# Altium PCB A313_6.PcbDoc (part 3 of 3)
Units mm, origin at the board's own origin, x right, y up, seen from the top; angles counter-clockwise.
Board outline 230.01 x 157.01 mm, 2 copper layers (Top Layer, Bottom Layer); 234 components, 195 nets, 1068 pads, 566 vias.
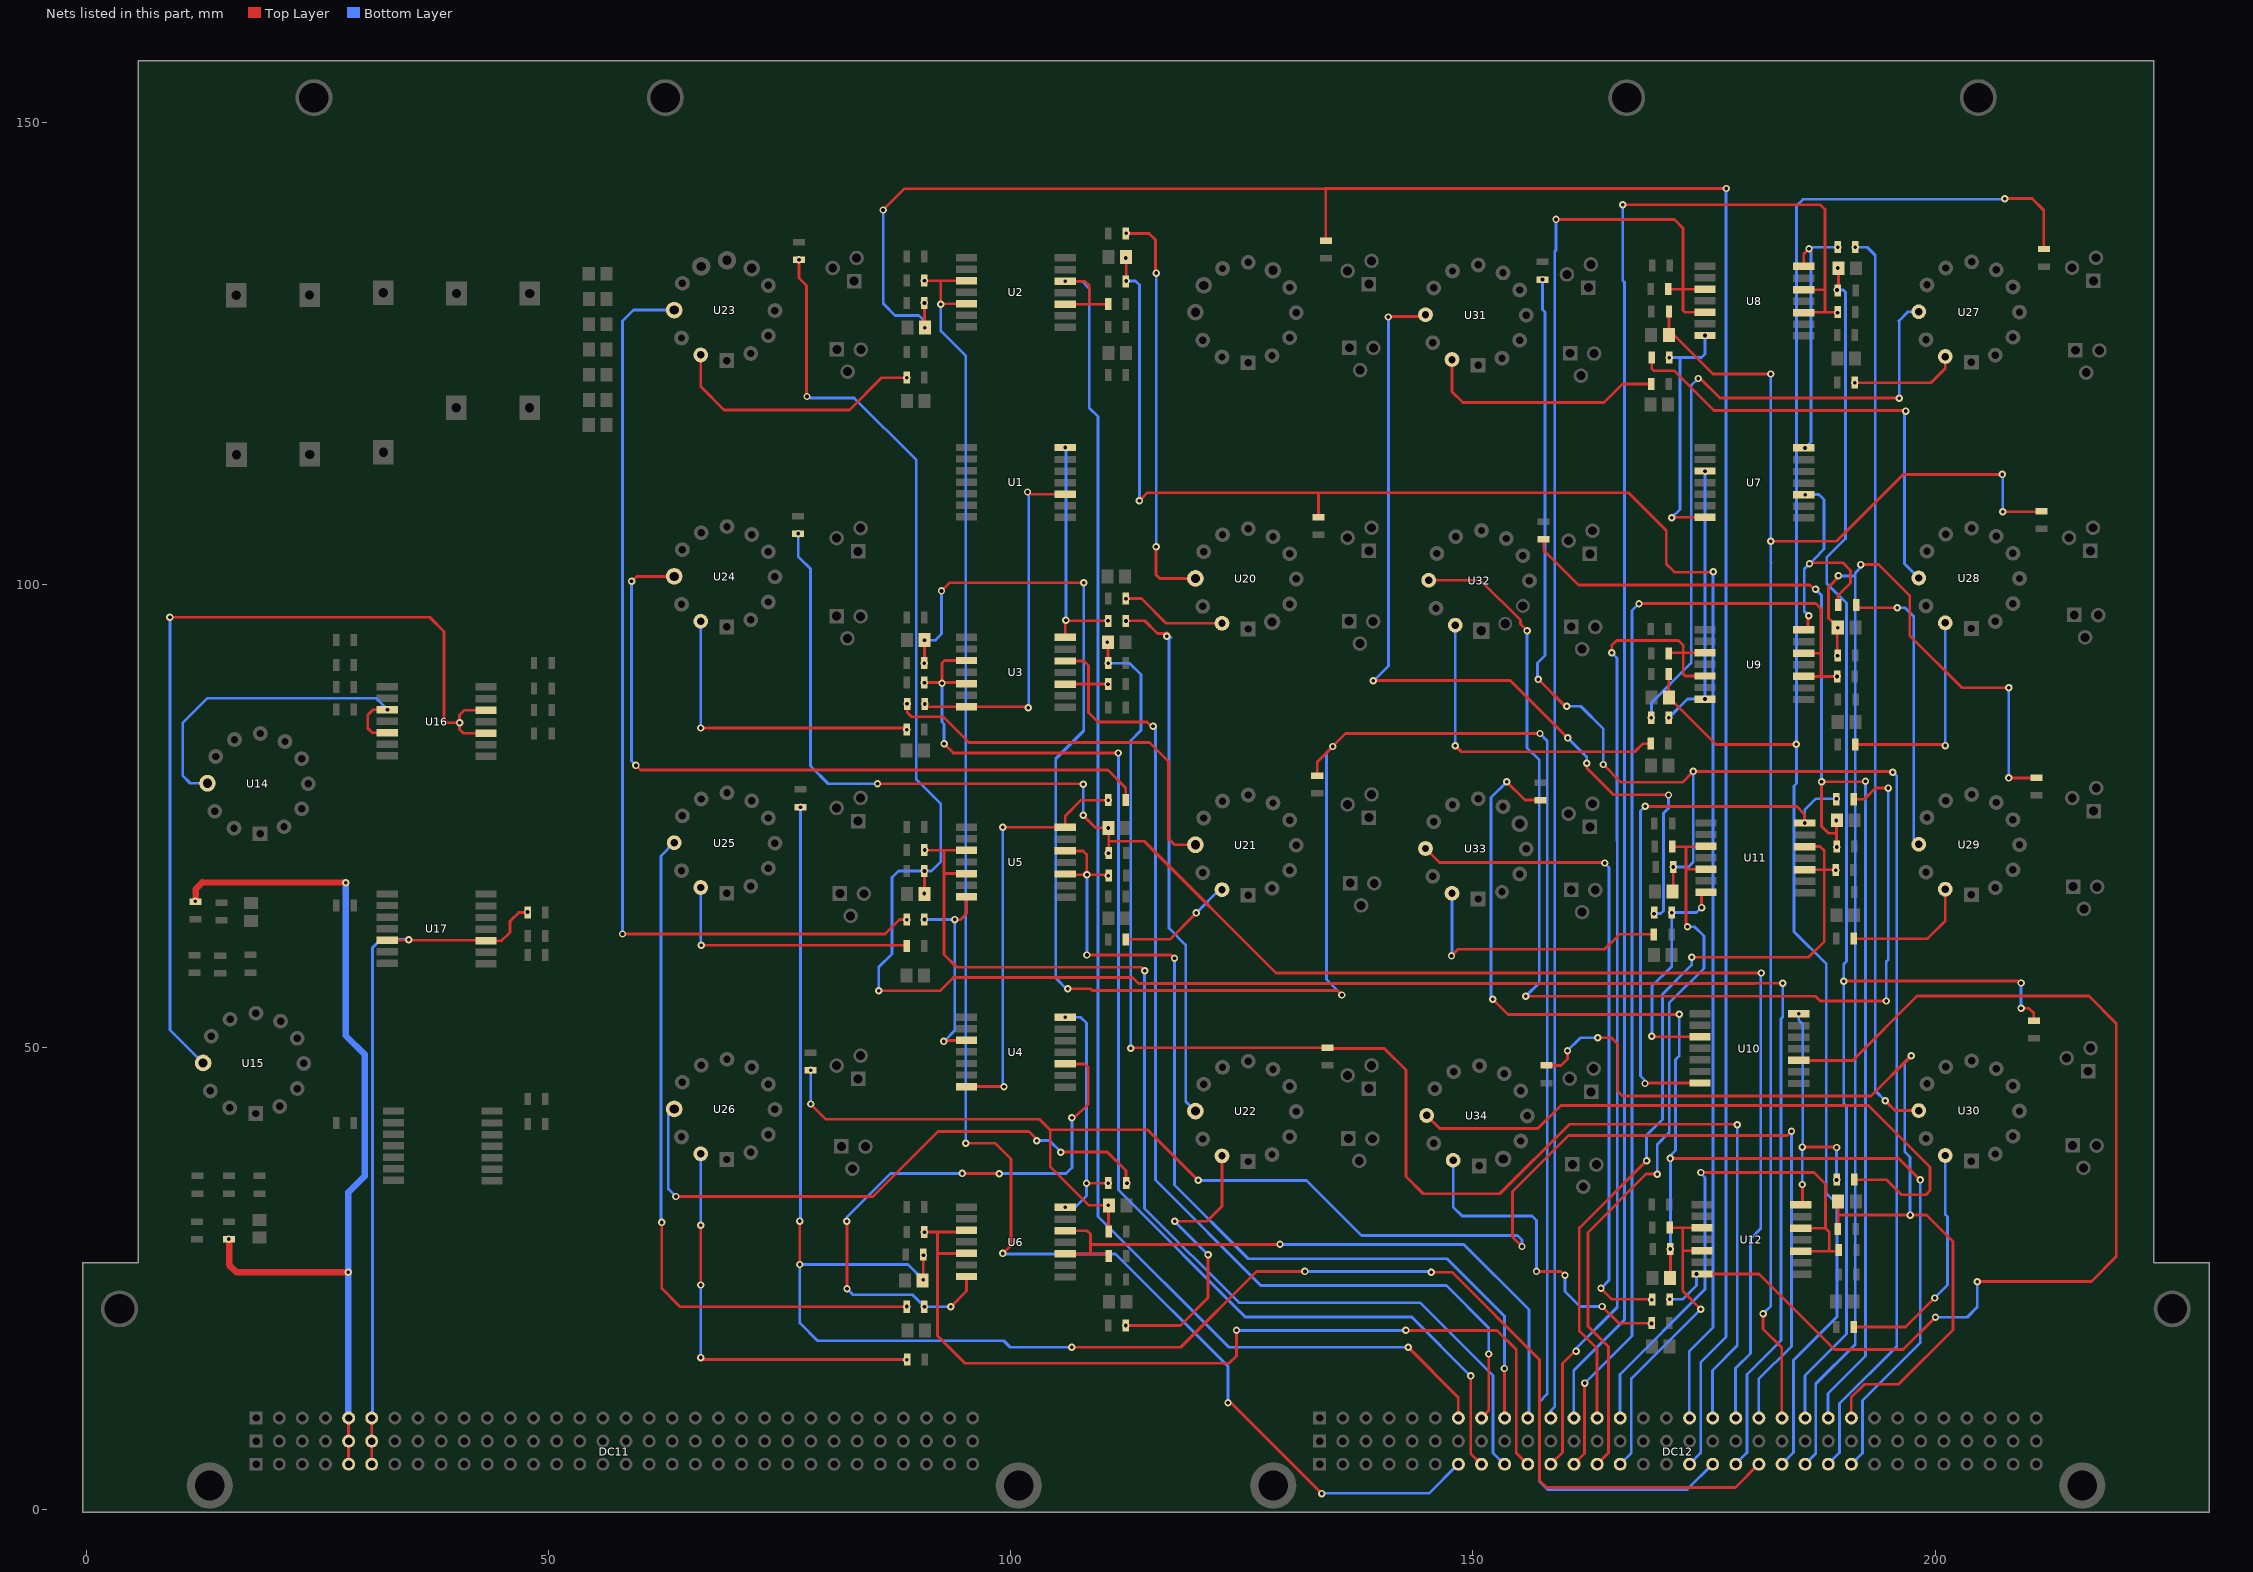
[diagram p3: the nets of this part, all layers, seen from the top]

## Via types
v1: diameter 0.8, hole 0.4, Top Layer to Bottom Layer, 566 vias

## Nets (pads, with @x,y where several pads share a name; then routed paths per layer and width w, separated by ;. In a path a pad name is that pad's centre, name@x,y a point inside that pad or via, vN(x,y) a via of type N, cw(c..) or ccw(c..) an arc to the next point about the centre after c; other vN are vias at no path point) (continued)
NetR40_2: R40.2 U20.10 | length 44.1
  Top Layer w0.3: R40.2@112.451,138.018 114.982,138.018 115.675,137.325 v1@115.675,133.725 ; v1@115.725,103.925 115.725,101.1 116.129,100.696 U20.10@119.985,100.696
  Bottom Layer w0.3: v1@115.75,103.95 v1(115.75,133.725)
  other v1: 115.725,104.125 112.5,138.025
NetR41_2: R41.2 U20.12 | length 11.5
  Top Layer w0.3: R41.2@112.451,98.518 114.157,98.518 116.83,95.845 U20.12@122.855,95.845
  other v1: 112.475,98.5
NetR43_1: R43.1 U1.10 U3.7 | length 38.4
  Top Layer w0.3: R43.1@90.674,87.107 90.96,86.821 U3.7@95.225,86.821 101.871,86.821 v1@101.9,86.85 ; v1@102.025,109.825 102.039,109.811 U1.10@105.9,109.811
  Bottom Layer w0.3: v1@101.925,86.95 101.965,86.99 101.965,110.04 v1@102.025,110.1
  other v1: 101.9,86.725 90.725,87.125 101.825,110.05
NetR43_2: R43.2 U21.10 | length 42.9
  Top Layer w0.3: R43.2@88.824,87.132 88.824,86.176 89.25,85.75 92.675,85.75 95.475,82.95 115.025,82.95 117.075,80.9 117.075,72.55 117.729,71.896 U21.10@119.985,71.896
  other v1: 88.8,87.15
NetR44_2: R44.2 U21.12 | length 12.9
  Top Layer w0.3: R44.2@112.451,61.668 117.218,61.668 v1(120.075,64.525)
  Bottom Layer w0.3: v1@120.335,64.525 v1(120.075,64.525) 122.595,67.045 U21.12@122.855,67.045
NetR46_1: R46.1 U1.14 U3.14 | length 24.9
  Top Layer w0.3: U3.14@105.9,94.321 105.9,95.775 106.243,96.118 R46.1@110.551,96.118
  Bottom Layer w0.3: v1(105.975,96.175) v1@105.975,114.861
  other v1: 110.525,96.125 105.9,114.861
NetR46_2: R46.2 U22.10 | length 58.4
  Top Layer w0.3: R46.2@112.451,96.118 114.507,96.118 115.875,94.75 v1@117.05,94.75
  Bottom Layer w0.3: v1@116.825,94.825 117.34,94.31 117.125,94.095 117.125,62.875 118.925,61.075 118.925,44.156 U22.10@119.985,43.096
  other v1: 116.875,94.45 112.475,96.1
NetR47_2: R47.2 U22.12 | length 31.1
  Top Layer w0.3: R47.2@112.451,19.918 118.368,19.918 121.35,22.9 v1(121.35,27.55) ; v1(117.75,31.175) 121.225,31.175 122.855,32.805 U22.12@122.855,38.245
  Bottom Layer w0.3: v1(117.75,31.175) 117.75,31.15 v1(121.35,27.55)
  other v1: 112.45,19.9
NetR49_1: R49.1 U4.3 U5.7 | length 23.1
  Top Layer w0.3: v1(92.775,50.625) 92.891,50.741 U4.3@95.225,50.741 ; v1@93.95,63.775 94.55,63.775 95.225,64.45 U5.7@95.225,66.281
  Bottom Layer w0.3: v1(90.674,63.807) v1(93.95,63.807) 93.95,51.8 v1@92.95,50.8 ; v1@92.65,50.8 v1@92.95,50.8 ; v1(92.775,50.625) v1@92.95,50.8
NetR49_2: R49.2 U23.10 | length 103.8
  Top Layer w0.3: v1(58.025,62.25) 86.425,62.25 87.982,63.807 R49.2@88.774,63.807
  Bottom Layer w0.3: v1(58.025,62.25) 58.025,128.55 59.196,129.721 U23.10@63.61,129.721
  other v1: 88.75,63.775
NetR50_2: R50.2 U23.12 | length 28.2
  Top Layer w0.3: U23.12@66.48,124.87 66.48,121.445 69,118.925 82.55,118.925 86.032,122.407 v1(88.774,122.407)
NetR52_1: R52.1 U4.7 U5.14 | length 45.8
  Top Layer w0.3: U4.7@95.225,45.741 v1@99.275,45.741 ; v1@98.931,73.781 v1(99.15,73.781) U5.14@105.9,73.781 105.9,75.025 107.593,76.718 R52.1@110.551,76.718
  Bottom Layer w0.3: v1@99.15,45.6 v1(99.15,73.781)
  other v1: 99.275,45.725 110.55,76.725
NetR52_2: R52.2 U24.10 | length 80.2
  Top Layer w0.3: v1(59.003,100.38) 59.544,100.921 U24.10@63.61,100.921 ; v1(59.475,80.475) 59.975,79.975 110.525,79.975 112.451,78.049 R52.2@112.451,76.718
  Bottom Layer w0.3: v1(59.003,100.38) 59.003,80.947 v1(59.475,80.475)
NetR53_2: R53.2 U24.12 | length 33.9
  Top Layer w0.3: v1(66.48,84.52) 88.687,84.52 R53.2@88.774,84.607
  Bottom Layer w0.3: U24.12@66.48,96.07 v1(66.48,84.52) v1@66.5,84.5
  other v1: 88.775,84.325
NetR55_1: R55.1 U4.10 U6.7 | length 64
  Top Layer w0.3: v1(82.3,23.875) v1@82.3,31.175 ; v1(93.525,21.925) 95.225,23.625 U6.7@95.225,25.201 ; v1(94.775,36.35) 98.75,36.35 v1(98.775,36.325) ; U4.10@105.9,48.191 107.984,48.191 108.4,47.775 108.4,43.875 v1@106.85,42.325
  Bottom Layer w0.3: v1(82.3,23.875) 82.95,23.225 89.381,23.225 v1(90.674,21.932) 93.518,21.932 v1(93.525,21.925) ; 82.3,31.625 87.025,36.35 v1(94.775,36.35) ; v1@98.775,36.35 106,36.35 106.625,36.975 v1(106.625,42.375)
  other v1: 82.275,31.175
NetR55_2: R55.2 U25.10 | length 75.9
  Top Layer w0.3: v1(62.275,31.05) 62.275,23.9 64.243,21.932 R55.2@88.774,21.932
  Bottom Layer w0.3: v1@62.175,31.25 62.175,70.686 U25.10@63.61,72.121
  other v1: 88.775,21.95
NetR56_2: R56.2 U25.12 | length 28.8
  Top Layer w0.3: v1(66.525,61.035) 88.696,61.035 R56.2@88.774,60.957
  Bottom Layer w0.3: U25.12@66.48,67.27 66.48,61.08 v1(66.525,61.035) v1@66.525,60.775
NetR58_1: R58.1 U4.14 U6.14 | length 26.4
  Top Layer w0.3: v1(108.2,35.293) R58.1@110.576,35.293
  Bottom Layer w0.3: v1(105.9,32.701) 107.001,32.701 108.2,33.9 v1(108.2,35.293) 108.2,52.6 107.559,53.241 v1(105.9,53.241)
  other v1: 110.55,35.275
NetR58_2: R58.2 U26.10 | length 64.8
  Top Layer w0.3: v1(63.8,33.85) 85.125,33.85 92.162,40.887 101.988,40.887 v1@102.85,40.025 ; v1@105.4,38.675 110.45,38.675 112.476,36.649 R58.2@112.476,35.293
  Bottom Layer w0.3: U26.10@63.61,43.321 62.975,42.686 62.975,34.675 v1(63.8,33.85) v1@63.825,33.85 ; v1(102.825,39.9) 104.175,39.9 v1(105.425,38.65)
  other v1: 112.574,35.3
NetR59_2: R59.2 U26.12 | length 44.8
  Top Layer w0.3: v1@66.375,24.175 v1(66.48,24.28) v1(66.48,30.73) ; v1@66.625,16.175 66.682,16.232 R59.2@88.799,16.232
  Bottom Layer w0.3: v1@66.375,30.625 v1(66.48,30.73) U26.12@66.48,38.47 ; v1(66.48,24.28) v1(66.48,16.434) v1@66.682,16.232
  other v1: 88.75,16.2
NetR61_1: R61.1 U7.3 U9.7 | length 29.4
  Bottom Layer w0.3: v1(171.174,85.632) 173.194,87.652 v1(175.099,87.652) v1(175.099,112.275)
NetR61_2: R61.2 U27.10 | length 72.4
  Top Layer w0.3: v1(174.375,122.325) 174.575,122.325 176.7,120.2 v1(196.1,120.2)
  Bottom Layer w0.3: v1@169.299,85.524 169.299,87.249 173.6,91.55 173.6,121.55 v1(174.375,122.325) ; v1(196.1,120.2) 196.1,128.507 196.054,128.554 197.046,129.546 U27.10@198.21,129.546
  other v1: 169.274,85.632
NetR62_2: R62.2 U27.12 | length 11.7
  Top Layer w0.3: R62.2@191.276,121.868 199.543,121.868 201.08,123.405 U27.12@201.08,124.695
  other v1: 191.3,121.85
NetR64_1: R64.1 U7.7 U8.7 | length 27.5
  Top Layer w0.3: v1(171.5,107.275) 171.539,107.314 U7.7@175.099,107.314 ; v1(175.099,126.976) U8.7@175.2,126.875
  Bottom Layer w0.3: v1(171.224,124.582) 172.375,124.582 ; v1(171.5,107.275) 172.4,108.175 172.4,124.557 172.375,124.582 ; v1(175.099,126.976) 175.099,124.976 174.705,124.582 172.375,124.582
NetR64_2: R64.2 U28.10 | length 49.4
  Top Layer w0.3: R64.2@169.324,124.582 169.324,123.401 169.575,123.15 171.775,123.15 176.05,118.875 v1@196.925,118.875
  Bottom Layer w0.3: v1@196.675,118.875 196.675,102.281 U28.10@198.21,100.746
  other v1: 196.8,118.8
NetR65_2: R65.2 U28.12 | length 23.3
  Top Layer w0.3: R65.2@191.326,82.743 200.962,82.743 v1(201.08,82.625)
  Bottom Layer w0.3: v1@201.05,82.4 201.08,82.43 v1(201.08,82.625) U28.12@201.08,95.895
NetR67_1: R67.1 U7.10 U9.14 | length 26.7
  Top Layer w0.3: U7.10@185.774,109.764 v1(185.95,109.764) ; U9.14@186.224,95.227 v1@186.224,96.549 ; v1@186.4,102.4 190,102.4 190.835,101.565 190.835,100.21 189.476,98.851 R67.1@189.476,97.868
  Bottom Layer w0.3: v1(185.95,109.764) 187.436,109.764 187.975,109.225 187.975,103.875 186.975,102.875 v1@186.525,102.425 ; v1(186.3,96.675) 185.825,97.15 185.825,101.725 v1(186.4,102.3) v1@186.525,102.425 ; v1@186.525,102.125 v1@186.525,102.425
NetR67_2: R67.2 U29.10 | length 31.6
  Top Layer w0.3: R67.2@191.426,97.818 191.719,97.525 v1(195.875,97.525)
  Bottom Layer w0.3: v1(195.875,97.525) 196.725,97.525 197.675,96.575 197.675,72.481 U29.10@198.21,71.946
NetR68_2: R68.2 U29.12 | length 14.1
  Top Layer w0.3: R68.2@191.201,61.743 199.168,61.743 201.08,63.655 U29.12@201.08,67.095
NetR70_1: R70.1 U7.14 U8.14 | length 27.7
  Top Layer w0.3: U7.14@185.575,115.013 U7.14@185.774,114.814 v1(185.911,114.814) ; U8.14@185.774,134.476 185.774,135.799 v1(186.339,136.364)
  Bottom Layer w0.3: v1(185.911,114.814) 186.55,115.453 186.55,116.425 186.55,136.461 v1@186.493,136.518 ; v1(186.339,136.364) v1@186.493,136.518 ; v1(189.451,136.518) v1@186.493,136.518
NetR70_2: R70.2 U30.10 | length 98.5
  Top Layer w0.3: v1@194.425,44.05 194.75,44.05 195.654,43.146 U30.10@198.21,43.146
  Bottom Layer w0.3: v1(191.351,136.518) 192.642,136.518 193.51,135.65 193.51,45.29 v1(194.575,44.225)
NetR71_2: R71.2 U30.12 | length 26.1
  Top Layer w0.3: R71.2@191.176,19.743 196.793,19.743 v1(199.925,22.875)
  Bottom Layer w0.3: v1(199.925,22.875) 201.325,24.275 201.325,31.675 201.08,31.92 U30.12@201.08,38.295
NetR73_1: R73.1 U10.3 U11.7 | length 25.2
  Top Layer w0.3: v1@169.376,51.126 U10.3@174.55,51.126 ; v1(174.725,65.1) 174.725,66.7 174.776,66.751 U11.7@175.2,66.751
  Bottom Layer w0.3: v1@169.35,51 v1(169.35,51.2) 169.35,56.6 171.499,58.749 v1(171.499,64.557) 174.182,64.557 v1(174.725,65.1)
NetR73_2: R73.2 U31.10 | length 95.8
  Top Layer w0.3: v1(139.225,89.625) 139.275,89.675 154.025,89.675 v1(160.25,83.45) ; v1@140.85,129.021 U31.10@144.86,129.021 ; v1(162.3,80.7) 162.3,80.2 165.2,77.3 v1@171.15,77.3
  Bottom Layer w0.3: v1(139.225,89.625) 140.85,91.25 v1@140.85,129.1 ; v1(160.25,83.45) 162.3,81.4 v1(162.3,80.7) ; v1(169.575,64.45) 170.3,64.45 170.6,64.75 170.6,75.3 171.15,75.85 v1(171.15,77.275)
  other v1: 140.85,128.975
NetR74_2: R74.2 U31.12 | length 26.8
  Top Layer w0.3: U31.12@147.73,124.37 147.73,120.895 148.9,119.725 164.15,119.725 166.157,121.732 R74.2@169.274,121.732 169.299,121.757 R74.2@169.299,122.157
NetR76_1: R76.1 U10.7 U11.14 | length 60.3
  Top Layer w0.3: v1@168.625,76.025 185.025,76.025 185.875,75.175 v1(185.875,74.251) 186.075,74.251 U11.14@186.125,74.301 ; v1@168.901,46.126 U10.7@174.55,46.126
  Bottom Layer w0.3: v1(168.625,76.05) 168.125,75.55 168.125,46.875 v1@168.888,46.113 ; v1(185.875,74.251) 185.875,75.675 187.079,76.879 v1(189.309,76.879)
  other v1: 168.6,46.075
NetR76_2: R76.2 U32.10 | length 120.3
  Top Layer w0.3: U32.10@145.21,100.496 150.829,100.496 155.125,96.2 155.125,95.775 v1(155.85,95.05) ; v1(155.711,55.511) 187.05,55.511 187.561,55 v1(194.7,55) ; R76.2@191.201,76.818 192.318,76.818 193.525,78.025 v1(194.9,78.025)
  Bottom Layer w0.3: v1(155.711,55.511) 157.175,56.975 157.175,81.05 155.85,82.375 v1(155.85,95.05) ; v1(194.7,55) 194.7,59.25 194.9,59.45 v1(194.9,78.025)
NetR77_2: R77.2 U32.12 | length 34.8
  Top Layer w0.3: v1(148.08,82.605) 148.735,81.95 167.5,81.95 168.382,82.832 R77.2@169.224,82.832
  Bottom Layer w0.3: v1(148.08,82.605) U32.12@148.08,95.645
NetR79_1: R79.1 U10.10 U12.7 | length 122.7
  Top Layer w0.3: U12.7@174.775,25.476 180.924,25.476 189.1,17.3 196.525,17.3 v1(200.025,20.8) ; U10.10@185.225,48.576 191.076,48.576 198.025,55.525 216.625,55.525 219.575,52.575 219.575,27.35 216.875,24.65 v1(204.525,24.65) v1@204.3,24.65 ; v1@199.912,20.8 v1@199.912,20.912
  Bottom Layer w0.3: v1(171.274,22.732) 172.657,22.732 174.175,24.25 v1(174.175,25.475) ; v1(200.025,20.8) 203.45,20.8 204.525,21.875 v1(204.525,24.65)
NetR79_2: R79.2 U33.10 | length 72.6
  Top Layer w0.3: U33.10@144.86,71.496 146.379,69.978 164.197,69.978 v1(164.25,69.925) ; v1(163.85,23.925) 165.043,22.732 R79.2@169.374,22.732
  Bottom Layer w0.3: v1(163.85,23.925) 164.725,24.8 164.725,69.45 v1(164.25,69.925)
  other v1: 169.35,22.7
NetR80_2: R80.2 U33.12 | length 29.4
  Top Layer w0.3: v1(147.675,59.875) 148.4,60.6 164.225,60.6 165.832,62.207 R80.2@169.574,62.207
  Bottom Layer w0.3: v1@147.73,60.15 U33.12@147.73,66.645
NetR82_1: R82.1 U10.14 U12.14 | length 28.1
  Top Layer w0.3: U12.14@185.45,32.976 185.625,33.151 v1@185.625,34.95 ; v1(185.6,39.2) 189.325,39.2 189.275,39.15 v1(189.325,39.15)
  Bottom Layer w0.3: v1(185.225,53.626) 185.225,52.95 185.667,52.508 v1@185.667,39.175 ; v1(185.6,39.2) 185.6,35.175 v1(185.625,35.15) ; v1(189.325,35.65) v1(189.325,39.15)
NetR82_2: R82.2 U34.10 | length 70.4
  Top Layer w0.3: U34.10@144.985,42.621 146.406,41.2 157,41.2 159.5,43.7 192.775,43.7 199.425,37.05 199.425,34.5 198.975,34.05 196.325,34.05 194.707,35.668 R82.2@191.226,35.668
NetR83_2: R83.2 U34.12 | length 36.1
  Top Layer w0.3: v1(156.875,25.75) 159.525,25.75 v1(159.95,25.325) ; v1@163.875,22.05 v1(163.961,21.964) 165.768,20.157 R83.2@169.349,20.157
  Bottom Layer w0.3: U34.12@147.855,37.77 147.855,32.72 148.835,31.74 156.375,31.74 156.875,31.24 v1(156.875,25.75) ; v1(159.95,25.325) 159.95,23.6 161.586,21.964 v1(163.961,21.964)
  other v1: 169.3,20.125
NetU14_10: U14.10 U16.3 U16.5 | length 38.6
  Top Layer w0.3: U16.5@32.575,84.001 30.974,84.001 30.475,84.5 30.475,85.95 31.026,86.501 U16.3@32.575,86.501 v1(32.601,86.501)
  Bottom Layer w0.3: U14.10@13.135,78.546 11.279,78.546 10.45,79.375 10.45,85.05 13.15,87.75 31.352,87.75 v1(32.601,86.501)
NetU15_10: U15.10 U16.10 U16.12 | length 98.9
  Top Layer w0.3: v1(9.075,96.5) 37.175,96.5 38.725,94.95 38.725,85.475 39.1,85.1 v1(40.4,85.1) ; U16.10@43.25,83.951 40.824,83.951 40.4,84.375 v1(40.4,85.1) ; U16.12@43.25,86.451 40.926,86.451 40.4,85.925 v1(40.4,85.1)
  Bottom Layer w0.3: v1(9.075,96.5) 9.075,51.881 U15.10@12.66,48.296
VIH.1A=: DC12.A7 R85.1 U2.3 U2.5 | length 181.5
  Top Layer w0.3: v1(90.674,132.907) 90.68,132.901 92.378,132.901 ; v1(92.45,130.35) v1@92.45,130.401 ; v1(95.15,39.625) 98.325,39.625 100.025,37.925 100.025,28.575 v1(99.15,27.7) ; U2.5@95.225,130.401 v1@92.45,130.401 ; U2.3@95.225,132.901 92.378,132.901 ; v1(123.5,11.55) 123.825,11.55 v1(133.65,1.725) ; 92.378,132.901 92.45,132.829 v1@92.45,130.401
  Bottom Layer w0.3: v1(92.45,130.35) 92.45,127.45 95.15,124.75 v1(95.15,39.625) ; v1@99.375,27.65 111.35,27.65 123.5,15.5 v1(123.5,11.55) ; v1@133.45,1.75 145.25,1.75 DC12.A7@148.4,4.9
VIH.1A==: C1.2 DC12.A17 R39.2 R86.2 | length 255.8
  Top Layer w0.3: v1(86.2,140.55) 88.5,142.85 134,142.85 ; v1(90.674,130.493) 90.674,127.901 C1.2@90.725,127.85 ; R39.2@134.075,137.376 134.075,142.775 134,142.85 ; v1(177.4,142.875) 134.025,142.875 134,142.85
  Bottom Layer w0.3: v1(86.2,140.55) 86.225,140.525 86.225,130.419 87.494,129.15 90.075,129.15 90.725,128.5 v1(90.725,127.825) ; DC12.A17@173.4,4.9 174.625,6.125 174.625,15.9 177.375,18.65 v1@177.375,142.575
VIH.1B=: DC12.C7 R87.1 U2.10 U2.12 | length 163.3
  Top Layer w0.3: U2.10@105.9,130.351 108.525,130.351 ; U2.12@106.126,132.625 v1(105.9,132.851) 107.999,132.851 108.5,132.35 108.5,130.376 108.525,130.351 ; R87.1@110.551,130.393 110.509,130.351 108.525,130.351 ; v1(143,17.55) 148.4,12.15 DC12.C7@148.4,9.9
  Bottom Layer w0.3: v1(105.9,132.851) 107.699,132.851 108.5,132.05 108.5,119.15 109.45,118.2 109.45,31.7 123.6,17.55 v1(143,17.55) ; DC12.C7@148.4,9.9 DC12.C7@148.4,10.45
VIH.1B==: C5.2 DC12.C17 R42.2 R88.2 | length 191.1
  Top Layer w0.3: R88.2@112.451,132.818 v1(112.5,132.867) C5.2@112.5,135.45 ; v1(113.925,109.1) 114.8,109.975 133.282,109.975 ; R42.2@133.282,107.326 133.282,109.97 166.805,109.97 170.9,105.875 170.9,102.25 171.775,101.375 v1@175.95,101.375
  Bottom Layer w0.3: v1(112.5,132.867) 113.508,132.867 113.925,132.45 v1(113.925,109.1) ; DC12.C17@173.4,9.9 173.4,17.125 175.95,19.675 v1@175.95,101.65
  other v1: 175.975,101.425 112.451,135.355
VIH.2A=: DC12.A8 R89.1 U3.3 U3.5 | length 139.1
  Top Layer w0.3: R89.1@90.674,89.432 v1@92.575,89.432 ; v1(92.8,82.825) 93.8,81.825 v1(111.65,81.825) ; U3.5@95.225,89.321 95.114,89.432 v1@92.575,89.432 ; U3.3@95.225,91.821 92.85,91.821 92.575,91.546 v1@92.575,89.432 ; v1(149.75,14.45) 149.75,6.05 DC12.A8@150.9,4.9
  Bottom Layer w0.3: v1(92.575,89.375) 92.575,85.175 92.8,84.95 v1(92.8,82.825) ; v1(111.65,81.825) 111.65,34.551 125.376,20.825 143.375,20.825 v1(149.75,14.45)
  other v1: 90.675,89.425
VIH.2A==: C7.2 DC12.A18 R45.2 R90.2 | length 257.1
  Top Layer w0.3: R90.2@90.674,91.568 v1(90.674,94.024) C7.2@90.675,94.025 ; v1(92.525,99.35) 93.4,100.225 v1(107.9,100.225) ; v1(106.175,56.325) 108.625,56.325 108.825,56.125 135.35,56.125 v1(135.825,55.65) ; R45.2@133.157,79.376 133.157,80.857 136.225,83.925 v1(157.25,83.925)
  Bottom Layer w0.3: v1(90.674,94.024) 91.874,94.024 92.525,94.675 v1(92.525,99.35) ; v1@106.1,56.25 104.875,57.475 104.875,81.2 107.9,84.225 v1(107.9,100.225) ; v1(134.85,82.525) 134.165,81.84 134.165,57.31 v1(135.825,55.65) ; v1(157.25,83.925) 158.025,83.15 158.025,12.475 157.175,11.625 157.175,3.05 158.075,2.15 173.15,2.15 DC12.A18@175.9,4.9
  other v1: 90.65,91.525
VIH.2B=: DC12.C8 R91.1 U3.10 U3.12 | length 121.8
  Top Layer w0.3: U3.10@105.9,89.271 108.421,89.271 ; U3.12@105.9,91.771 107.929,91.771 108.421,91.279 108.421,89.271 ; R91.1@110.551,89.293 110.529,89.271 108.421,89.271 ; v1@115.3,84.625 114.765,85.16 109.44,85.16 108.421,86.179 108.421,89.271 ; DC12.C8@150.9,9.9 151.7,10.7 151.7,16.725 v1@151.725,16.75
  Bottom Layer w0.3: v1@115.65,84.575 115.65,35.625 127.05,24.225 147.125,24.225 151.7,19.65 v1(151.7,16.825) v1@151.7,16.675
  other v1: 115.4,84.725 110.525,89.25
VIH.2B==: C9.2 DC12.C18 R48.2 R92.2 | length 162.3
  Top Layer w0.3: C9.2@110.525,93.8 110.525,91.558 v1(110.551,91.532) ; v1(113,49.9) 113.051,49.951 R48.2@134.282,49.951 ; R48.2@134.132,49.876 140.405,49.876 142.75,47.531 142.75,36.025 144.625,34.15 152.9,34.15 160.425,41.675 v1@178.575,41.675
  Bottom Layer w0.3: v1(110.551,91.532) 112.868,91.532 114.1,90.3 114.1,84.275 113,83.175 113,73.225 v1(113,49.9) ; v1@112.735,49.9 v1@112.867,50.032 ; DC12.C18@175.9,9.9 175.9,15.05 178.575,17.725 v1(178.575,41.6)
  other v1: 110.45,93.8
VIH.3A=: DC12.A9 R93.1 U5.3 U5.5 | length 121.9
  Top Layer w0.3: R93.1@90.674,71.307 92.8,71.307 ; U5.5@95.109,68.897 U5.5@95.225,68.781 92.856,68.781 92.8,68.725 ; U5.3@95.225,71.281 95.199,71.307 92.8,71.307 ; v1(114.5,58.275) 114.125,58.65 94.175,58.65 92.8,60.025 92.8,68.725 ; 92.8,68.725 92.8,71.307
  Bottom Layer w0.3: v1@114.475,58.275 114.475,32.575 124.675,22.375 144.275,22.375 152.166,14.484 152.166,6.134 DC12.A9@153.4,4.9
  other v1: 90.7,71.325
VIH.3A==: C11.2 DC12.A19 R51.2 R94.2 | length 248.2
  Top Layer w0.3: v1(77.1,135.15) 77.1,133.192 77.918,132.374 v1@77.918,120.15 ; v1(85.725,56.1) 92.35,56.1 93.8,57.55 113.166,57.55 113.816,56.9 180.55,56.9 180.575,56.925 v1(183.5,56.925) ; v1(90.674,69.068) 90.674,66.576 C11.2@90.675,66.575
  Bottom Layer w0.3: 78.375,120.225 83.075,120.225 89.8,113.5 89.8,78.95 92.45,76.3 92.45,70.1 91.418,69.068 v1(90.674,69.068) 87.868,69.068 87.175,68.375 87.175,60.1 85.725,58.65 v1(85.725,56.1) ; DC12.A19@178.4,4.9 179.65,6.15 179.65,14.625 183.3,18.275 183.3,53.075 183.5,53.275 v1(183.5,56.925)
  other v1: 90.65,66.625 77.975,120.375
VIH.3B=: DC12.C9 R95.1 U5.10 U5.12 | length 104.5
  Top Layer w0.3: U5.10@105.9,68.731 105.981,68.65 v1(108.25,68.65) ; U5.12@105.9,71.231 107.844,71.231 108.219,70.856 108.219,69.081 108.65,68.65 R95.1@110.544,68.65 ; v1(108.25,59.975) 117.375,59.975 v1(117.725,59.625) ; DC12.C9@153.4,9.9 153.4,15.2 v1@153.425,15.225
  Bottom Layer w0.3: v1(108.25,59.975) v1(108.25,68.65) ; v1(117.725,59.625) 117.725,35.1 125.7,27.125 147.175,27.125 153.4,20.9 v1(153.4,15.25)
  other v1: 110.55,68.55
VIH.3B==: C13.2 DC12.C19 R54.2 R96.2 | length 190.9
  Top Layer w0.3: v1(85.6,78.5) 107.8,78.5 v1(107.85,78.45) ; v1(107.85,75.075) 109.2,73.725 C13.2@110.6,73.725 ; R96.2@110.599,71.157 110.6,71.158 110.6,72.272 ; C13.2@110.6,73.6 110.6,72.272 ; v1(181.176,58.025) 128.7,58.025 114.453,72.272 110.6,72.272
  Bottom Layer w0.3: v1(77.018,105.549) 77.018,103.082 78.35,101.75 78.35,80.425 80.275,78.5 v1(85.6,78.5) ; v1(107.85,75.075) v1(107.85,78.45) ; DC12.C19@178.4,9.9 178.4,15.275 180,16.875 180,29.267 181.128,30.395 v1@181.128,58.025
  other v1: 110.575,70.975 110.55,73.7
VIH.4A=: DC12.A10 R97.1 U6.3 U6.5 | length 99.8
  Top Layer w0.3: R97.1@90.649,30.007 92.1,30.007 ; U6.5@95.225,27.701 92.149,27.701 92.1,27.75 ; U6.3@95.225,30.201 95.031,30.007 92.1,30.007 ; v1(124.425,19.375) 124.425,16.625 123.625,15.825 95.075,15.825 92.1,18.8 92.1,27.75 ; v1(142.75,19.375) 152.6,19.375 154.675,17.3 154.675,6.125 DC12.A10@155.9,4.9 ; 92.1,27.75 92.1,30.007
  Bottom Layer w0.3: v1@124.3,19.25 v1(124.425,19.375) v1(142.75,19.375)
  other v1: 90.675,30
VIH.4A==: C15.2 DC12.A20 R57.2 R98.2 | length 199.1
  Top Layer w0.3: v1(77.2,26.5) v1(77.2,31.2) ; v1(90.551,24.851) R98.2@90.551,27.568 ; v1(106.6,17.55) 118.4,17.55 126.6,25.75 v1(131.825,25.75) ; v1(145.5,25.675) 147.725,25.675 157.2,16.2 157.2,3.15 157.975,2.375 178.375,2.375 DC12.A20@180.9,4.9
  Bottom Layer w0.3: v1(77.2,31.2) 77.275,31.275 v1(77.275,75.95) ; v1(90.551,24.851) 88.902,26.5 v1(77.2,26.5) 77.2,20.175 79.125,18.25 99.25,18.25 99.95,17.55 v1(106.6,17.55) ; v1(131.825,25.75) 145.225,25.75 v1@145.425,25.95
  other v1: 90.575,27.5
VIH.4B=: DC12.C10 R99.1 U6.10 U6.12 | length 71.9
  Top Layer w0.3: U6.10@105.9,27.651 108.625,27.651 ; U6.12@105.9,30.151 108.274,30.151 108.625,29.8 108.625,28.7 ; R99.1@110.626,27.568 110.543,27.651 108.625,27.651 ; v1(129.125,28.675) 108.625,28.675 108.625,27.651
  Bottom Layer w0.3: v1(129.125,28.675) 149,28.675 156.05,21.625 156.05,10.05 DC12.C10@155.9,9.9
VIH.4B==: C17.2 DC12.C20 R60.2 R100.2 | length 173.4
  Top Layer w0.3: v1@78.206,44.019 80.025,42.2 103.15,42.2 104.275,41.075 ; C17.2@110.575,32.4 110.575,30.106 R100.2@110.599,30.082 ; C17.2@110.625,32.9 108.475,32.9 104.275,37.1 104.275,41.075 ; v1(120.29,35.6) 114.815,41.075 104.275,41.075 ; v1@155.025,28.725 154.275,29.475 154.275,34.375 160.35,40.45 184,40.45 v1@184.462,40.912
  Bottom Layer w0.3: v1(78.368,47.499) v1(78.368,43.857) v1@78.4,43.825 ; v1(120.29,35.6) 132,35.6 137.95,29.65 154.8,29.65 155.3,29.15 v1(155.3,28.45) ; DC12.C20@180.9,9.9 180.9,14.1 184.45,17.65 v1(184.45,40.925)
  other v1: 110.55,32.925
VIH.5A=: DC12.A11 R101.1 U9.3 U9.5 | length 109.6
  Top Layer w0.3: DC12.A11@158.4,4.9 159.675,6.175 159.675,15.775 161.025,17.125 v1(161.15,17.125) ; v1(165,92.675) 165,93.425 165.55,93.975 172.225,93.975 172.75,93.45 172.75,92.652 ; R101.1@171.174,92.682 171.204,92.652 172.75,92.652 ; U9.5@175.099,90.152 172.948,90.152 172.75,90.35 172.75,92.652 ; U9.3@175.099,92.652 172.75,92.652
  Bottom Layer w0.3: v1@161,17.275 165.6,21.875 165.6,72.291 165.575,72.316 165.575,88.066 165.585,88.076 165.585,92.09 v1(165,92.675) v1@165,92.9
VIH.5A==: C19.2 DC12.A21 R102.2 R124.2 | length 190.8
  Top Layer w0.3: R102.2@171.176,90.368 171.176,87.849 C19.2@171.2,87.825 176.275,82.75 v1@184.75,82.75 ; v1(207.5,141.775) 210.475,141.775 211.732,140.518 R124.2@211.732,136.326
  Bottom Layer w0.3: DC12.A21@183.4,4.9 184.675,6.175 184.675,16.151 189.375,20.851 189.375,33.037 188.218,34.195 188.218,58.982 184.715,62.485 184.715,78.25 184.975,78.51 v1(184.975,82.775) 184.975,141 185.675,141.7 v1@207.7,141.7
VIH.5B=: DC12.C11 R103.1 U8.3 U8.5 | length 159.3
  Top Layer w0.3: v1(158.975,139.525) 171.775,139.525 172.724,138.576 172.724,131.976 ; R103.1@171.124,131.982 171.13,131.976 172.724,131.976 ; U8.5@175.099,129.476 172.925,129.476 172.724,129.677 172.724,131.976 ; U8.3@175.099,131.976 172.724,131.976
  Bottom Layer w0.3: DC12.C11@158.425,9.9 158.425,10.7 158.85,11.125 158.85,136.05 158.975,136.175 v1(158.975,139.525)
VIH.5B==: C21.2 DC12.C21 R66.2 R104.2 | length 165.1
  Top Layer w0.3: R104.2@171.201,129.543 171.201,127.051 C21.2@171.175,127.025 171.75,127.025 175.963,122.813 v1(182.213,122.813) ; v1(181.375,21.175) 181.375,19.525 183.4,17.5 DC12.C21@183.4,9.9 ; v1(182.213,104.725) 189.308,104.725 196.533,111.95 v1(207.225,111.95) ; v1(207.299,107.901) R66.2@210.932,107.901
  Bottom Layer w0.3: v1(181.375,21.175) 182.213,22.013 182.213,102.388 ; v1(182.213,122.813) v1(182.213,104.725) 182.213,102.388 ; 182.225,102.4 182.213,102.388 ; v1(207.225,111.95) 207.299,111.876 v1(207.299,107.901)
VIH.6A=: DC12.A12 R105.1 U9.10 U9.12 | length 128.8
  Top Layer w0.3: DC12.A12@160.9,4.9 162.075,6.075 v1@162.075,13.775 ; v1(167.95,97.975) 187.1,97.975 187.65,97.425 187.65,90.1 ; U9.10@185.774,90.102 185.776,90.1 187.65,90.1 ; U9.12@185.774,92.602 187.6,92.602 ; R105.1@189.376,90.068 189.344,90.1 187.65,90.1
  Bottom Layer w0.3: v1(162.1,13.675) 167.2,18.775 167.2,97.225 v1(167.95,97.975)
  other v1: 189.375,90.1
VIH.6A==: C23.2 DC12.A22 R69.2 R106.2 | length 148
  Top Layer w0.3: R106.2@189.399,92.357 189.4,92.358 C23.2@189.4,94.975 ; C23.2@189.45,95.4 188.45,96.4 188.45,99.75 v1@189.75,101.05 ; v1(191.925,102.2) 193.875,102.2 197.225,98.85 197.225,94.525 202.876,88.874 v1(207.949,88.874) ; v1@207.925,79.15 v1(207.949,79.126) R69.2@210.932,79.126
  Bottom Layer w0.3: DC12.A22@185.9,4.9 187.075,6.075 187.075,13.6 191.34,17.865 191.34,100.975 ; v1(189.525,100.975) 191.34,100.975 ; v1(191.925,102.2) 191.925,101.885 191.34,101.3 191.34,100.975 ; v1(207.949,79.126) v1(207.949,88.874) v1@208.175,89.1
  other v1: 189.425,92.332 189.461,95.35
VIH.6B=: DC12.C12 R107.1 U8.10 U8.12 | length 172.9
  Top Layer w0.3: v1(166.2,141.125) 187.55,141.125 188.058,140.617 188.058,132 ; U8.10@185.774,129.426 185.841,129.493 188.058,129.493 ; U8.12@185.774,131.926 187.984,131.926 188.058,132 ; R107.1@189.426,129.493 188.058,129.493 ; 188.058,129.493 188.058,132
  Bottom Layer w0.3: DC12.C12@160.9,9.9 160.9,15.025 166.4,20.525 166.4,132.725 166.2,132.925 v1@166.2,141.075 ; v1@166.125,141.15 v1@166.2,141.075 ; v1(166.2,141.125) v1@166.2,141.075
  other v1: 189.425,129.425
VIH.6B==: C25.2 DC12.C22 R72.2 R108.2 | length 153.9
  Top Layer w0.3: R108.2@189.474,131.857 189.525,131.908 C25.2@189.525,134.25 ; v1(190.1,57.15) 209.05,57.15 v1@209.275,56.925 ; v1(209.275,54.225) 210.1,54.225 210.657,53.668 R72.2@210.657,52.851 R72.2@210.508,53
  Bottom Layer w0.3: DC12.C22@185.9,9.9 185.9,14.5 190.4,19 190.4,43.6 190.1,43.9 v1(190.1,57.15) 190.1,58.975 190.4,59.275 190.4,98.025 188.25,100.175 188.25,102.95 190.301,105.001 190.301,131.649 190.05,131.9 v1(189.375,131.9) ; v1(209.275,54.225) v1(209.275,56.95) v1@209.275,57.15
  other v1: 189.451,134.271
VIH.7A=: DC12.A13 R109.1 U11.3 U11.5 | length 81.2
  Top Layer w0.3: DC12.A13@163.4,4.9 164.643,6.143 164.643,17.607 162.425,19.825 162.425,29.975 168.725,36.275 v1(169.925,36.275) ; R109.1@171.574,71.682 173.032,71.682 ; v1@173.032,62.957 173.032,69.2 ; U11.5@175.2,69.251 173.083,69.251 173.032,69.2 ; U11.3@175.2,71.751 175.131,71.682 173.032,71.682 ; 173.032,69.2 173.032,71.682
  Bottom Layer w0.3: v1(169.925,36.275) 169.925,39.5 171.215,40.79 171.215,54.765 174.975,58.525 174.975,62.025 173.975,63.025 v1(173.2,63.025)
VIH.7A==: C27.2 DC12.A23 R75.2 R110.2 | length 182
  Top Layer w0.3: v1(157.075,89.775) 159.975,86.875 v1(160.125,86.875) ; v1(164.1,80.575) 166.025,78.65 172.65,78.65 v1(173.825,79.825) v1@195.425,79.825 ; C27.2@171.6,67.075 171.651,67.126 v1(171.651,69.493)
  Bottom Layer w0.3: v1@156.975,89.875 156.975,91.55 157.8,92.375 157.8,129.493 157.518,129.775 v1(157.518,133.024) ; v1(160.125,86.875) 161.653,86.875 164.1,84.428 v1(164.1,80.575) ; v1(171.651,69.493) 173.293,69.493 173.825,70.025 v1(173.825,79.825) ; DC12.A23@188.4,4.9 189.65,6.15 189.65,11.475 195.825,17.65 195.825,79.325 v1(195.4,79.75)
VIH.7B=: DC12.C13 R111.1 U11.10 U11.12 | length 86.2
  Top Layer w0.3: DC12.C13@163.4,9.9 163.4,17.4 161.5,19.3 161.5,30.45 v1(168.775,37.725) ; v1(173.65,59.725) 186.275,59.725 188,61.45 188,69.201 ; U11.10@185.875,69.201 188,69.201 ; U11.12@185.875,71.701 187.549,71.701 188,71.25 188,69.201 ; R111.1@189.251,69.168 189.218,69.201 188,69.201
  Bottom Layer w0.3: v1(168.775,37.725) 168.775,40.475 170.5,42.2 170.5,55.725 173.65,58.875 v1(173.65,59.725)
  other v1: 189.225,69.15
VIH.7B==: C29.2 DC12.C23 R78.2 R112.2 | length 137.9
  Top Layer w0.3: R78.2@157.643,104.924 157.643,103.757 161.425,99.975 186.45,99.975 186.975,99.45 v1(187.05,99.525) ; v1(187.7,78.7) 192.375,78.7 v1(192.45,78.775) ; v1@187.838,78.562 187.7,78.425 187.7,73.9 188.453,73.147 189.325,73.147 ; C29.2@189.325,74.1 189.325,73.147 ; R112.2@189.349,71.707 189.325,71.731 189.325,73.147
  Bottom Layer w0.3: v1(187.05,99.525) 187.7,98.875 v1(187.7,78.7) ; DC12.C23@188.4,9.9 188.4,12.55 192.45,16.6 v1(192.45,78.775)
  other v1: 189.326,71.65 189.3,74.525
VIH.8A=: DC12.A14 R113.1 U12.3 U12.5 | length 35.7
  Top Layer w0.3: R113.1@171.299,30.482 172.682,30.482 ; v1(174.625,21.675) 172.682,23.618 172.682,27.95 ; U12.5@174.775,27.976 172.708,27.976 172.682,27.95 ; U12.3@174.775,30.476 174.769,30.482 172.682,30.482 ; 172.682,27.95 172.682,30.482
  Bottom Layer w0.3: DC12.A14@165.9,4.9 167.125,6.125 167.125,14.175 174.55,21.6 v1@174.55,21.825
VIH.8A==: C31.2 DC12.A24 R81.2 R114.2 | length 139.5
  Top Layer w0.3: v1(152.15,55.175) 153.775,53.55 v1(172.3,53.55) ; v1(153.65,78.7) 155.626,76.724 R81.2@157.293,76.724 ; C31.2@171.35,25.55 171.351,25.551 v1(171.351,28.168) ; v1(171.351,37.975) 196.05,37.975 v1(198.375,35.65)
  Bottom Layer w0.3: v1(152.15,55.175) 151.94,55.385 151.94,76.99 v1(153.65,78.7) ; v1(171.351,28.168) v1(171.351,37.975) ; v1@171.351,38.301 171.9,38.85 171.9,48.65 172.3,49.05 v1(172.3,53.55) ; DC12.A24@190.925,4.9 192.125,6.1 192.125,11.8 198.388,18.063 198.375,18.075 v1(198.375,35.65)
VIH.8B=: DC12.C14 R115.1 U12.10 U12.12 | length 58.8
  Top Layer w0.3: v1(174.65,36.45) 186.875,36.45 188.125,35.2 188.125,30.426 ; U12.10@185.45,27.926 R115.1@189.577,27.926 ; U12.12@185.45,30.426 188.125,30.426 ; 188.525,27.968 188.525,30.026 188.125,30.426
  Bottom Layer w0.3: DC12.C14@165.9,9.9 165.9,14.625 175.1,23.825 175.1,35.9 v1@174.55,36.45
VIH.8B==: C33.2 DC12.C24 R84.2 R116.2 | length 108.8
  Top Layer w0.3: R84.2@157.932,48.026 159.526,48.026 160.225,48.725 v1(160.225,49.625) ; v1(163.5,51.025) 164.975,51.025 165.65,50.35 165.65,45.25 166.175,44.725 193.05,44.725 v1(197.4,49.075) ; R116.2@189.286,30.344 189.5,30.558 189.5,31.845 ; C33.2@189.5,33.3 189.5,31.845 ; DC12.C24@190.9,9.9 190.9,12.1 192.35,13.55 196.025,13.55 201.9,19.425 201.9,28.975 199.03,31.845 v1(197.275,31.845) 189.5,31.845
  Bottom Layer w0.3: v1(160.225,49.625) 161.625,51.025 v1(163.5,51.025) ; v1(197.275,31.845) 197.275,38.135 196.685,38.725 196.7,48.375 v1(197.4,49.075)
XUNG400HZ: DC11.A6 DC11.B6 DC11.C6 R34.2 U17.5 U17.10 | length 77.4
  Top Layer w0.3: DC11.A6@30.9,4.9 DC11.B6@30.9,7.4 DC11.C6@30.9,9.9 ; U17.5@32.575,61.576 U17.10@43.2,61.576 ; U17.10@43.25,61.526 44.951,61.526 45.85,62.425 45.85,63.625 46.807,64.582 R34.2@47.774,64.582
  Bottom Layer w0.3: DC11.C6@30.9,9.9 30.985,9.985 30.985,60.76 31.9,61.675 34.675,61.675 v1@34.9,61.45
  other v1: 34.9,61.625 47.75,64.625
~5V/400HZ: DC11.A5 DC11.B5 DC11.C5 R63.1 R119.1 | length 98.4
  Top Layer w0.3: DC11.A5@28.4,4.9 DC11.B5@28.4,7.4 DC11.C5@28.4,9.9
  Top Layer w0.7: R63.1@11.843,65.749 11.843,67.093 12.575,67.825 v1(28.1,67.8) ; R119.1@15.475,29.25 15.475,26.45 16.275,25.65 v1(28.375,25.65)
  Bottom Layer w0.3: DC11.C5@28.1,9.875 DC11.C5@28.1,9.9 ; DC11.C5@28.375,9.925 DC11.C5@28.4,9.9
  Bottom Layer w0.7: v1(28.1,67.8) 28.1,51.25 30.125,49.225 30.125,36.05 28.375,34.3 v1(28.375,25.65) DC11.C5@28.375,9.925
  other v1: 15.452,29.25 11.825,65.775
pads on no net: DC11.A DC11.A9 DC11.A10 DC11.A11 DC11.A12 DC11.A13 DC11.A14 DC11.A15 DC11.A16 DC11.A17 DC11.A18 DC11.A19 DC11.A20 DC11.A21 DC11.A22 DC11.A23 DC11.A24 DC11.A25 DC11.A26 DC11.A27 DC11.A28 DC11.A29 DC11.A30 DC11.B DC11.B9 DC11.B10 DC11.B11 DC11.B12 DC11.B13 DC11.B14 DC11.B15 DC11.B16 DC11.B17 DC11.B18 DC11.B19 DC11.B20 DC11.B21 DC11.B22 DC11.B23 DC11.B24 DC11.B25 DC11.B26 DC11.B27 DC11.B28 DC11.B29 DC11.B30 DC11.C9 DC11.C10 DC11.C11 DC11.C12 DC11.C13 DC11.C14 DC11.C15 DC11.C16 DC11.C17 DC11.C18 DC11.C19 DC11.C20 DC11.C21 DC11.C22 DC11.C23 DC11.C24 DC11.C25 DC11.C26 DC11.C27 DC11.C28 DC11.C29 DC11.C30 DC12.A DC12.A5 DC12.A6 DC12.A15 DC12.A16 DC12.A25 DC12.A26 DC12.A27 DC12.A28 DC12.A29 DC12.B DC12.B5 DC12.B6 DC12.B7 DC12.B8 DC12.B9 DC12.B10 DC12.B11 DC12.B12 DC12.B13 DC12.B14 DC12.B15 DC12.B16 DC12.B17 DC12.B18 DC12.B19 DC12.B20 DC12.B21 DC12.B22 DC12.B23 DC12.B24 DC12.B25 DC12.B26 DC12.B27 DC12.B28 DC12.B29 DC12.C5 DC12.C6 DC12.C15 DC12.C16 DC12.C25 DC12.C26 DC12.C27 DC12.C28 DC12.C29 U1.4 U2.4 U3.4 U4.4 U5.4 U6.4 U7.4 U8.4 U9.4 U10.4 U11.4 U12.4 U14.2 U14.3 U14.6 U14.8 U14.11 U15.2 U15.3 U15.6 U15.8 U15.11 U16.4 U17.4 U18.4 U18.5 U18.6 U18.7 U18.8 U18.9 U18.10 U19.2 U19.3 U19.6 U19.8 U19.11 U20.2 U20.3 U20.6 U20.8 U20.11 U21.2 U21.3 U21.6 U21.8 U21.11 U22.2 U22.3 U22.6 U22.8 U22.11 U23.2 U23.3 U23.6 U23.8 U23.11 U24.2 U24.3 U24.6 U24.8 U24.11 U25.2 U25.3 U25.6 U25.8 U25.11 U26.2 U26.3 U26.6 U26.8 U26.11 U27.2 U27.3 U27.6 U27.8 U27.11 U28.2 U28.3 U28.6 U28.8 U28.11 U29.2 U29.3 U29.6 U29.8 U29.11 U30.2 U30.3 U30.6 U30.8 U30.11 U31.2 U31.3 U31.6 U31.8 U31.11 U32.2 U32.3 U32.6 U32.8 U32.11 U33.2 U33.3 U33.6 U33.8 U33.11 U34.2 U34.3 U34.6 U34.8 U34.11

## Polygon pours and split planes (outlines as drawn)
A on Top Layer "Top Layer-No Net" (solid, remove dead copper, pour order 0): -0.37,-0.304 -0.37,26.696 cw(c-0.363,26.696) -0.363,26.703 5.63,26.703 5.63,156.696 cw(c5.637,156.696) 5.637,156.703 223.637,156.703 cw(c223.637,156.696) 223.644,156.696 223.644,26.703 229.637,26.703 cw(c229.637,26.696) 229.644,26.696 229.644,-0.304 cw(c229.637,-0.304) 229.637,-0.311 -0.363,-0.311 cw(c-0.363,-0.304)
A on Bottom Layer "Top Layer-No Net1" (solid, remove dead copper, pour order 1): -0.37,-0.304 -0.37,26.696 cw(c-0.363,26.696) -0.363,26.703 5.63,26.703 5.63,156.696 cw(c5.637,156.696) 5.637,156.703 223.637,156.703 cw(c223.637,156.696) 223.644,156.696 223.644,26.703 229.637,26.703 cw(c229.637,26.696) 229.644,26.696 229.644,-0.304 cw(c229.637,-0.304) 229.637,-0.311 -0.363,-0.311 cw(c-0.363,-0.304)

## Keep-outs
Keep-Out Layer:
  lines w0.254: 7.65,1.525 7.65,149.75 221.475,149.75 221.475,-0.3

## Other copper
Top Layer:
  rectangle net A: 5.625,149.875 223.625,156.7
  rectangle net A: 5.625,26.7 7.525,149.875
  rectangle net A: -0.375,-0.2 7.525,26.7
  rectangle net A: 221.6,26.7 223.625,149.925
  rectangle net A: 221.6,-0.3 229.65,26.7
Bottom Layer:
  rectangle net +12,6V: 139.95,3.875 142.1,10.95
  rectangle net -12,6V: 137.35,3.925 139.525,11
  rectangle net -23V: 134.8,3.925 136.825,10.975
  rectangle net M_: 34.95,4.1 37.075,10.875
  rectangle net M: 32.625,4.05 34.45,10.875
  rectangle net XUNG400HZ: 29.95,4.05 31.9,10.825
  rectangle net ~5V/400HZ: 27.5,4.025 29.2,10.85
  rectangle net +6,3V: 24.975,4 26.775,10.85
  rectangle net +5V: 20,4.025 21.975,10.825
  rectangle net +3,5V: 22.5,4.05 24.425,10.875
  rectangle net +3,5V: 22.475,10.75 22.5,10.875
  rectangle net A: 5.625,149.875 223.65,156.7
  rectangle net A: 221.6,26.7 223.65,149.3
  rectangle net A: 221.6,-0.3 229.65,26.7
  rectangle net A: 5.625,26.7 7.55,149.875
  rectangle net A: -0.375,-0.325 7.55,26.7

## Silkscreen, mask and mechanical layers (free items; w line width, h text height)
Top Overlay:
  lines w0.254: 103.475,145.35 103.475,149.225 121.925,149.225 121.925,145.35 103.475,145.35
  text "A313-V.06" at 104.425,146.25 h2
  text "32" at 211.7,12.475 h0.8
  text "32" at 96.7,12.425 h0.8
  text "1" at 18.95,12 h0.8
  text "1" at 134.125,11.875 h0.8
Bottom Overlay:
  text "32" at 213.05,12.5 h0.8
  text "32" at 98.075,12.4 h0.8
  text "1" at 19.2,12.025 h0.8
  text "1" at 134.375,11.9 h0.8
Mechanical 1:
  drawing of 198 lines, arcs and shapes, not listed

## Text inside footprints (layer, text, board x,y; h text height)
C39: Top Overlay "+" at 47.425,134.725 h1.14 r270
C40: Top Overlay "+" at 16.85,110.775 h1.14 r90
C42: Top Overlay "+" at 24.8,110.9 h1.14 r90
C45: Top Overlay "+" at 31.575,134.85 h1.14 r270
C46: Top Overlay "+" at 39.5,134.775 h1.14 r270
DC11: Top Overlay "C" at 8.251,9.221 h1; Top Overlay "B" at 8.251,6.521 h1; Top Overlay "A" at 8.251,4.171 h1
DC12: Top Overlay "A" at 122.626,1.471 h1; Top Overlay "B" at 122.676,3.621 h1; Top Overlay "C" at 122.751,6.246 h1